# Altium PCB Balancer-v7.0.1.PcbDoc (part 2 of 3)
Units mil, origin at the board's own origin, x right, y up, seen from the top; angles counter-clockwise.
Board outline 2856.3 x 1161.42 mil, 2 copper layers (Top Layer, Bottom Layer), stack 30.709 mil thick; 20 components, 16 nets, 58 pads, 112 vias.
Unrouted connection lines stored in the file: 10.
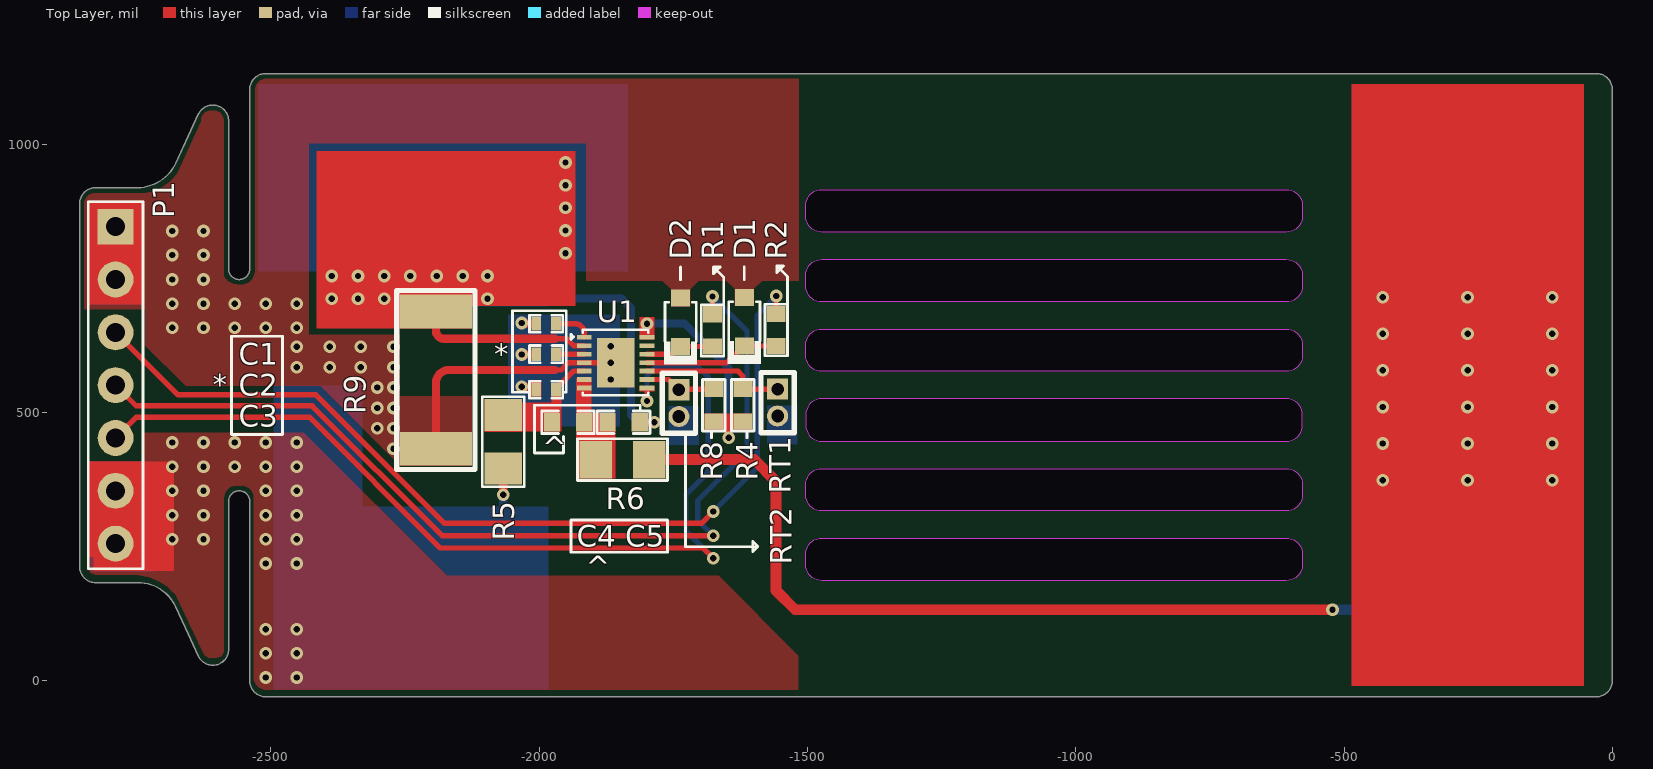
[diagram p0: Top Layer view]

## Silkscreen, mask and mechanical layers (free items; w line width, h text height) (continued)
Bottom Overlay: (continued)
  lines w3.28: -4518.4,-25.22 cw(c-4517.21,-26.34) -4516.01,-27.46 ; -1777.95,993.11 ccw(c-1776.31,993.11) -1774.67,993.11 ; -1777.95,1026.68 cw(c-1776.31,1026.68) -1774.67,1026.68 ; -1776.31,991.47 cw(c-1776.31,993.11) -1776.31,994.75 ; -1776.31,1025.04 cw(c-1776.31,1026.68) -1776.31,1028.32 ; -1758.3,1058.49 cw(c-1756.66,1058.61) -1755.03,1058.73 ; -1758.3,1058.65 ccw(c-1756.66,1058.61) -1755.02,1058.56 ; -1757.48,1025.04 ccw(c-1757.48,1026.68) -1757.48,1028.32 ; -1755.84,991.47 ccw(c-1755.84,993.11) -1755.84,994.75 ; -1741.92,839.08 ccw(c-1740.29,839.2) -1738.65,839.32 ; -1704.26,785.17 cw(c-1704.26,786.8) -1704.26,788.44 ; -1700.99,1083.17 ccw(c-1700.99,1084.8) -1700.99,1086.44 ; -1699.36,1078.26 ccw(c-1697.72,1078.26) -1696.08,1078.26 ; -1699.36,1091.36 cw(c-1697.72,1091.36) -1696.08,1091.36 ; -1697.72,1076.62 cw(c-1697.72,1078.26) -1697.72,1079.9 ; -1697.72,1089.72 cw(c-1697.72,1091.36) -1697.72,1092.99 ; -1656.78,1078.26 ccw(c-1655.14,1078.26) -1653.5,1078.26 ; -1656.78,1091.36 cw(c-1655.14,1091.36) -1653.5,1091.36 ; -1655.2,1083.17 cw(c-1655.14,1084.8) -1655.08,1086.44 ; -1655.14,1076.62 ccw(c-1655.14,1078.26) -1655.14,1079.9 ; -1655.14,1089.72 ccw(c-1655.14,1091.36) -1655.14,1092.99 ; -1615.84,1084.71 cw(c-1614.21,1084.81) -1612.58,1084.9 ; -1615.84,1084.62 ccw(c-1614.21,1084.8) -1612.58,1084.99 ; -1614.21,1055.24 ccw(c-1612.57,1055.33) -1610.94,1055.42 ccw(c-1609.3,1055.33) -1607.66,1055.24 ; -1612.57,1053.69 cw(c-1612.57,1055.33) -1612.57,1056.97 ; -1609.3,1053.69 ccw(c-1609.3,1055.33) -1609.3,1056.97 ; -1609.3,1084.9 cw(c-1607.66,1084.81) -1606.03,1084.71 ; -1609.29,1084.99 ccw(c-1607.66,1084.8) -1606.04,1084.62 ; -1607.66,796.63 cw(c-1606.02,796.63) -1604.39,796.63 ; -1607.66,796.76 ccw(c-1606.02,796.63) -1604.39,796.51 ; -1588.01,1048.79 ccw(c-1586.38,1048.79) -1584.74,1048.79 ; -1588.01,1048.91 cw(c-1586.38,1048.79) -1584.74,1048.66 ; -1754.72,1069.38 ccw(c-1753.39,1068.43) -1752.05,1067.49 ccw(c-1753.39,1068.43) -1754.72,1069.38 ; -1734.1,1083.13 cw(c-1733.74,1081.53) -1733.38,1079.93 cw(c-1733.74,1081.53) -1734.1,1083.13 ; -1704.26,1083.17 ccw(c-1704.26,1084.8) -1704.26,1086.44 ccw(c-1704.26,1084.8) -1704.26,1083.17 ; -1656.78,1084.8 cw(c-1655.14,1084.8) -1653.5,1084.8 cw(c-1655.14,1084.8) -1656.78,1084.8 ; -1615.85,785.17 ccw(c-1615.85,786.8) -1615.85,788.44 ccw(c-1615.85,786.8) -1615.85,785.17 ; -1612.76,1079.9 cw(c-1612.57,1081.53) -1612.38,1083.16 cw(c-1612.57,1081.53) -1612.76,1079.9 ; -1597.18,1073.67 cw(c-1596.2,1074.98) -1595.21,1076.29 cw(c-1596.2,1074.98) -1597.18,1073.67 ; -1588.01,1055.33 cw(c-1586.38,1055.33) -1584.74,1055.33 cw(c-1586.38,1055.33) -1588.01,1055.33
  lines w6.55: -1824.44,1079.49 -1523.44,770.64 ; -1823.63,747.12 -1522.77,1069.86 ; -1757.48,1026.68 -1776.31,1026.68 -1776.31,993.11 -1755.84,993.11 ; -1740.29,839.2 -1756.66,1058.61 cw(c-1738.83,1058.12) -1753.39,1068.43 cw(c-1726.51,1049.39) -1733.74,1081.53 cw(c-1704.26,950.58) -1704.26,1084.8 -1700.99,1084.8 ; -1704.26,786.8 -1615.85,786.8 ccw(c-1615.85,796.63) -1606.02,796.63 -1586.38,1048.79 -1586.38,1055.33 ccw(c-1610.94,1055.33) -1596.2,1074.98 ccw(c-1616.54,1047.86) -1612.57,1081.53 ccw(c-1673.98,561.68) -1655.14,1084.8 ; -1655.14,1084.8 -1655.14,1091.36 -1697.72,1091.36 -1697.72,1078.26 -1655.14,1078.26 -1655.14,1084.8 ; -1771.4,1045.51 ccw(c-1771.4,1060.25) -1771.4,1074.98 ccw(c-1771.4,1060.25) -1771.4,1045.51 ; -1737.01,767.93 cw(c-1737.01,797.45) -1737.01,826.96 cw(c-1737.01,797.45) -1737.01,767.93 ; -1737.01,781.07 ccw(c-1737.01,797.45) -1737.01,813.82 ccw(c-1737.01,797.45) -1737.01,781.07 ; -1614.21,1084.81 cw(c-1610.94,1085.17) -1607.66,1084.81 -1609.3,1055.33 -1612.57,1055.33 -1614.21,1084.8
  text "BALANCER V.7.0.1" at -972,-9 h90
Bottom Solder:
  lines w5: -378.44,353.01 ccw(c-372.84,353.01) -372.84,347.41 -316.05,347.41 ccw(c-316.05,353.01) -310.44,353.01 -310.44,753.8 ccw(c-314.99,753.8) -314.99,758.34 -373.9,758.34 ccw(c-373.9,753.8) -378.44,753.8 -378.44,353.01
Dimensions:
  lines w5: -2856.3,364.17 -2856.3,738.19
Board Outline:
  lines w10: -2602.34,1072.65 ccw(c-2608.27,1043.72) -2635.04,1056.19 -2654.15,1015.14 -2677.63,964.75 ; -2602.34,1072.65 cw(c-2608.27,1043.72) -2578.85,1046.31 -2578.74,1043.73 ; -2677.64,964.72 cw(c-2749,998) -2749,919.26 -2826.77,919.26 -2829.35,919.15 ccw(c-2826.77,889.73) -2856.3,889.73 -2856.3,212.63 ccw(c-2826.77,212.63) -2826.77,183.1 -2741.77,183.1 cw(c-2748.65,104.66) -2677.28,137.91 -2653.81,87.52 -2635.04,46.17 ccw(c-2608.27,58.64) -2578.74,58.64 -2578.74,334.65 cw(c-2559.06,334.65) -2539.37,334.65 -2539.37,0 ccw(c-2509.84,0) -2509.84,-29.53 -29.53,-29.53 ccw(c-29.53,0) 0,0 0,1102.36 ccw(c-29.53,1102.36) -29.53,1131.89 -2509.84,1131.89 ccw(c-2509.84,1102.36) -2539.37,1102.36 -2539.37,767.72 cw(c-2559.06,767.72) -2578.74,767.72 -2578.74,1043.72 ; -2677.64,964.72 -2677.63,964.75 ; -2578.74,1043.72 ccw(c-2610.66,1043.73) -2578.74,1043.73 ; -1503.09,216.54 ccw(c-1473.43,216.54) -1473.43,186.87 ; -1503.09,216.54 ccw(c-1473.43,216.54) -1473.43,186.87 ; -1503.09,216.54 ccw(c-1473.43,216.54) -1473.43,186.87 ; -1503.09,216.54 -1503.09,236.22 ; -1503.09,236.22 cw(c-1473.43,236.22) -1473.43,265.89 ; -1503.09,236.22 cw(c-1473.43,236.22) -1473.43,265.89 ; -1503.09,236.22 cw(c-1473.43,236.22) -1473.43,265.89 ; -1503.09,346.46 ccw(c-1473.43,346.46) -1473.43,316.79 ; -1503.09,346.46 ccw(c-1473.43,346.46) -1473.43,316.79 ; -1503.09,346.46 ccw(c-1473.43,346.46) -1473.43,316.79 ; -1503.09,346.46 -1503.09,366.14 ; -1503.09,366.14 cw(c-1473.43,366.14) -1473.43,395.81 ; -1503.09,366.14 cw(c-1473.43,366.14) -1473.43,395.81 ; -1503.09,366.14 cw(c-1473.43,366.14) -1473.43,395.81 ; -1503.09,476.38 ccw(c-1473.43,476.38) -1473.43,446.71 ; -1503.09,476.38 ccw(c-1473.43,476.38) -1473.43,446.71 ; -1503.09,476.38 ccw(c-1473.43,476.38) -1473.43,446.71 ; -1503.09,476.38 -1503.09,496.06 ; -1503.09,496.06 cw(c-1473.43,496.06) -1473.43,525.73 ; -1503.09,496.06 cw(c-1473.43,496.06) -1473.43,525.73 ; -1503.09,496.06 cw(c-1473.43,496.06) -1473.43,525.73 ; -1503.09,606.3 ccw(c-1473.43,606.3) -1473.43,576.63 ; -1503.09,606.3 ccw(c-1473.43,606.3) -1473.43,576.63 ; -1503.09,606.3 ccw(c-1473.43,606.3) -1473.43,576.63 ; -1503.09,606.3 -1503.09,625.98 ; -1503.09,625.98 cw(c-1473.43,625.98) -1473.43,655.65 ; -1503.09,625.98 cw(c-1473.43,625.98) -1473.43,655.65 ; -1503.09,625.98 cw(c-1473.43,625.98) -1473.43,655.65 ; -1503.09,736.22 ccw(c-1473.43,736.22) -1473.43,706.55 ; -1503.09,736.22 ccw(c-1473.43,736.22) -1473.43,706.55 ; -1503.09,736.22 ccw(c-1473.43,736.22) -1473.43,706.55 ; -1503.09,736.22 -1503.09,755.91 ; -1503.09,755.91 cw(c-1473.43,755.91) -1473.43,785.57 ; -1503.09,755.91 cw(c-1473.43,755.91) -1473.43,785.57 ; -1503.09,755.91 cw(c-1473.43,755.91) -1473.43,785.57 ; -1503.09,866.14 ccw(c-1473.43,866.14) -1473.43,836.47 ; -1503.09,866.14 ccw(c-1473.43,866.14) -1473.43,836.47 ; -1503.09,866.14 ccw(c-1473.43,866.14) -1473.43,836.47 ; -1503.09,866.14 -1503.09,885.83 ; -1503.09,885.83 cw(c-1473.43,885.83) -1473.43,915.5 ; -1503.09,885.83 cw(c-1473.43,885.83) -1473.43,915.5 ; -1503.09,885.83 cw(c-1473.43,885.83) -1473.43,915.5 ; -1473.43,186.87 -607.28,186.87 ; -1473.43,265.89 -607.28,265.89 ; -1473.43,316.79 -607.28,316.79 ; -1473.43,395.81 -607.28,395.81 ; -1473.43,446.71 -607.28,446.71 ; -1473.43,525.73 -607.28,525.73 ; -1473.43,576.63 -607.28,576.63 ; -1473.43,655.65 -607.28,655.65 ; -1473.43,706.55 -607.28,706.55 ; -1473.43,785.57 -607.28,785.57 ; -1473.43,836.47 -607.28,836.47 ; -1473.43,915.5 -607.28,915.5 ; -607.28,186.87 ccw(c-607.28,216.54) -577.61,216.54 ; -607.28,186.87 ccw(c-607.28,216.54) -577.61,216.54 ; -607.28,186.87 ccw(c-607.28,216.54) -577.61,216.54 ; -607.28,265.89 cw(c-607.28,236.22) -577.61,236.22 ; -607.28,265.89 cw(c-607.28,236.22) -577.61,236.22 ; -607.28,265.89 cw(c-607.28,236.22) -577.61,236.22 ; -607.28,316.79 ccw(c-607.28,346.46) -577.61,346.46 ; -607.28,316.79 ccw(c-607.28,346.46) -577.61,346.46 ; -607.28,316.79 ccw(c-607.28,346.46) -577.61,346.46 ; -607.28,395.81 cw(c-607.28,366.14) -577.61,366.14 ; -607.28,395.81 cw(c-607.28,366.14) -577.61,366.14 ; -607.28,395.81 cw(c-607.28,366.14) -577.61,366.14 ; -607.28,446.71 ccw(c-607.28,476.38) -577.61,476.38 ; -607.28,446.71 ccw(c-607.28,476.38) -577.61,476.38 ; -607.28,446.71 ccw(c-607.28,476.38) -577.61,476.38 ; -607.28,525.73 cw(c-607.28,496.06) -577.61,496.06 ; -607.28,525.73 cw(c-607.28,496.06) -577.61,496.06 ; -607.28,525.73 cw(c-607.28,496.06) -577.61,496.06 ; -607.28,576.63 ccw(c-607.28,606.3) -577.61,606.3 ; -607.28,576.63 ccw(c-607.28,606.3) -577.61,606.3 ; -607.28,576.63 ccw(c-607.28,606.3) -577.61,606.3 ; -607.28,655.65 cw(c-607.28,625.98) -577.61,625.98 ; -607.28,655.65 cw(c-607.28,625.98) -577.61,625.98 ; -607.28,655.65 cw(c-607.28,625.98) -577.61,625.98 ; -607.28,706.55 ccw(c-607.28,736.22) -577.61,736.22 ; -607.28,706.55 ccw(c-607.28,736.22) -577.61,736.22 ; -607.28,706.55 ccw(c-607.28,736.22) -577.61,736.22 ; -607.28,785.57 cw(c-607.28,755.91) -577.61,755.91 ; -607.28,785.57 cw(c-607.28,755.91) -577.61,755.91 ; -607.28,785.57 cw(c-607.28,755.91) -577.61,755.91 ; -607.28,836.47 ccw(c-607.28,866.14) -577.61,866.14 ; -607.28,836.47 ccw(c-607.28,866.14) -577.61,866.14 ; -607.28,836.47 ccw(c-607.28,866.14) -577.61,866.14 ; -607.28,915.5 cw(c-607.28,885.83) -577.61,885.83 ; -607.28,915.5 cw(c-607.28,885.83) -577.61,885.83 ; -607.28,915.5 cw(c-607.28,885.83) -577.61,885.83 ; -577.61,216.54 -577.61,236.22 ; -577.61,346.46 -577.61,366.14 ; -577.61,476.38 -577.61,496.06 ; -577.61,606.3 -577.61,625.98 ; -577.61,736.22 -577.61,755.91 ; -577.61,866.14 -577.61,885.83